# Altium PCB Shock_Sensor.PcbDoc (part 2 of 2)
Units mm, origin at the board's own origin, x right, y up, seen from the top; angles counter-clockwise.
Board outline 51.25 x 37.38 mm, 2 copper layers (Top Layer, Bottom Layer), stack 1.448 mm thick; 59 components, 38 nets, 215 pads, 74 vias.
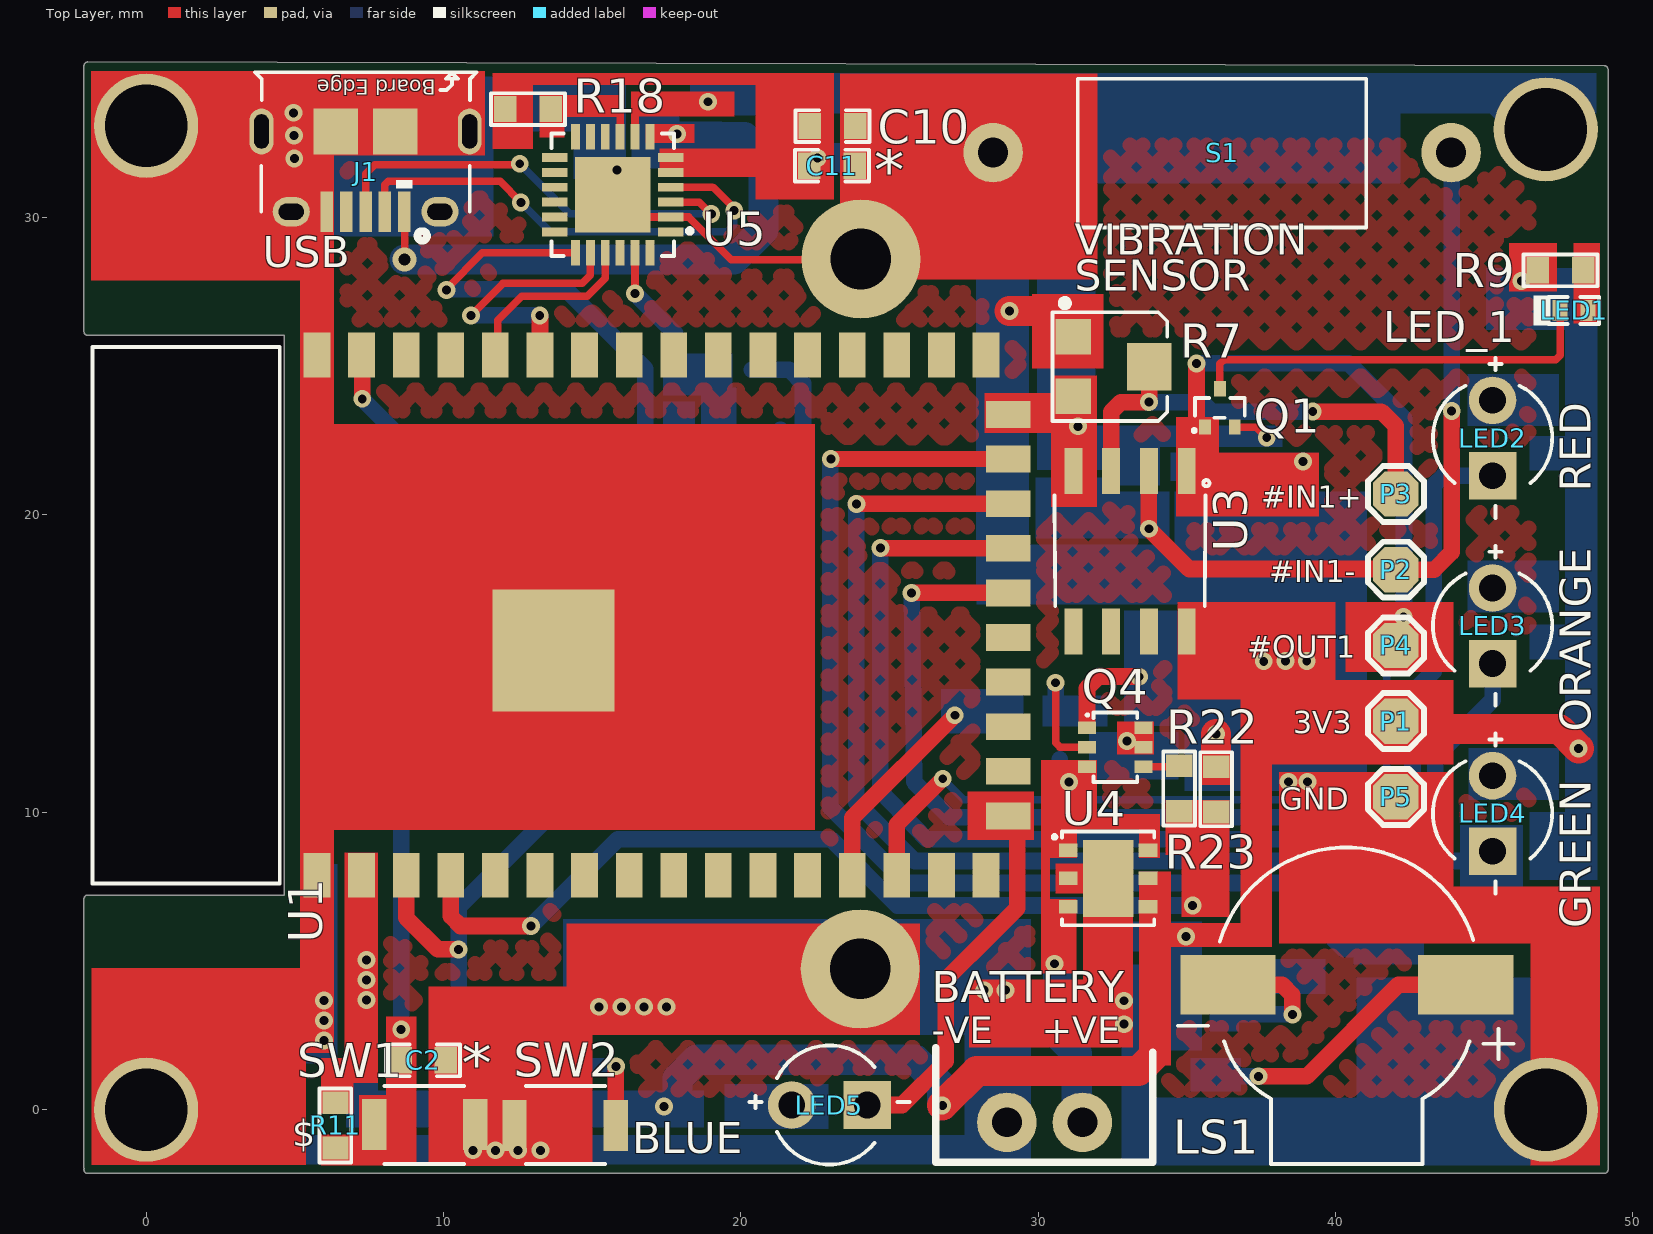
[diagram p0: Top Layer view]

## Part data (continued)
R12 R13 R14: library part RC0603FR-07560RL, "YAGEO - RC0603FR-07560RL - SMD Chip Resistor, 0603 [1608 Metric], 560 ohm, RC Series, 75 V, Thick Film, 100 mW", Case Code (Imperial)=0603, Case Code (Metric)=1608, Manufacturer=Yageo, Max Operating Temperature=155°C, Max Power Dissipation=100mW, Min Operating Temperature=-55°C, Package Quantity=5000, Resistance Tolerance=1%, Resistor Type="Thick Film", Supplier Part Number 1=311-560HRCT-ND, Temperature Coefficient=100ppm/°C, Voltage Rating=75V, Voltage Rating (DC)=50V, Case/Package=0603, Category="Chip SMD Resistors", ComponentLink1Description=https://datasheet.ciiva.com/11808/0900766b80f96399-11808127.pdf?src-supplier=RSComponents, ComponentLink1URL=https://datasheet.ciiva.com/11808/0900766b80f96399-11808127.pdf?src-supplier=RSComponents, ComponentLink2Description=https://datasheet.ciiva.com/46412/443971-46412853.pdf?src-supplier=Element14, ComponentLink2URL=https://datasheet.ciiva.com/46412/443971-46412853.pdf?src-supplier=Element14, ComponentLink3Description=https://datasheet.ciiva.com/7746/443971-7746374.pdf?src-supplier=Element14, ComponentLink3URL=https://datasheet.ciiva.com/7746/443971-7746374.pdf?src-supplier=Element14, ComponentLink4Description=https://datasheet.ciiva.com/7746/443971-7746375.pdf?src-supplier=Element14, ComponentLink4URL=https://datasheet.ciiva.com/7746/443971-7746375.pdf?src-supplier=Element14, ComponentLink5Description=https://datasheet.ciiva.com/2454/pyu-r-int-thick-7-2454381.pdf?src-supplier=Digi-Key, ComponentLink5URL=https://datasheet.ciiva.com/2454/pyu-r-int-thick-7-2454381.pdf?src-supplier=Digi-Key, ComponentLink6Description=https://datasheet.ciiva.com/2454/pyu-r-int-thick-7-2454382.pdf?src-supplier=Digi-Key, ComponentLink6URL=https://datasheet.ciiva.com/2454/pyu-r-int-thick-7-2454382.pdf?src-supplier=Digi-Key, ComponentLink7Description=https://datasheet.ciiva.com/2454/pyu-r-int-thick-7-2454383.pdf?src-supplier=Digi-Key, ComponentLink7URL=https://datasheet.ciiva.com/2454/pyu-r-int-thick-7-2454383.pdf?src-supplier=Digi-Key, Construction=Rectangular, Depth=0.8mm, Features="Moisture Resistant", Height=0.45mm, Lead Free="Lead Free", Length=1.6mm, Manufacturer Part Number=RC0603FR-07560RL, Military Standard=Not, Number of Pins=2, Number of Terminations=2, Packaging="Tape and Reel", Power Rating=100mW, Pricing 1="1=0.10000, 10=0.02400, 100=0.00970, 1000=0.00436, 2500=0.00378 (USD)", REACH SVHC="No SVHC", Resistance=560R, RoHS=Yes, RoHS Compliant=Yes, Series=RC, Stock 1=40728, Supplier 1=Digi-Key, Technology="THICK FILM", Termination=SMD/SMT, Tolerance=1%, Weight=7.1E-05oz, Width=0.8mm, Working Voltage=75V
R18: library part RMCF0603JJ1K00, "RES 1K OHM 5% 1/10W 0603", Case Code (Imperial)=0603, Case Code (Metric)=1608, Manufacturer="Stackpole Electronics", Max Operating Temperature=155°C, Max Power Dissipation=100mW, Min Operating Temperature=-55°C, Resistance=1kR, Resistor Type="Thick Film", Supplier Part Number 1=RMCF0603JJ1K00CT-ND, Temperature Coefficient=200ppm/°C, Tolerance=5%, Case/Package=0603, Category="Chip SMD Resistors", ComponentLink1Description=https://www.seielect.com/catalog/SEI-Packaging.pdf?src-supplier=Digi-Key, ComponentLink1URL=https://www.seielect.com/catalog/SEI-Packaging.pdf?src-supplier=Digi-Key, ComponentLink2Description=http://www.seielect.com/Catalog/SEI-RMCF_RMCP.pdf?src-supplier=Future+Electronics, ComponentLink2URL=http://www.seielect.com/Catalog/SEI-RMCF_RMCP.pdf?src-supplier=Future+Electronics, ComponentLink3Description=https://www.seielect.com/Catalog/SEI-RMCF_RMCP.pdf?src-supplier=Digi-Key, ComponentLink3URL=https://www.seielect.com/Catalog/SEI-RMCF_RMCP.pdf?src-supplier=Digi-Key, Features="Automotive AEC-Q200", Height=0.022inch, Lead Free="Lead Free", Length=0.061inch, Manufacturer Part Number=RMCF0603JJ1K00, Mount="Surface Mount", Number of Terminations=2, Packaging="Tape and Reel", Power Rating=100mW, Pricing 1="1=0.10000, 10=0.01500, 100=0.00610, 1000=0.00274, 2500=0.00238, 5000=0.00197 (USD)", RoHS=Yes, Stock 1=256965, Supplier 1=Digi-Key, Width=0.031inch
R19: library part ERJ-3EKF2212V, "RES SMD 22.1K OHM 1% 1/10W 0603", Case Code (Imperial)=0603, Case Code (Metric)=1608, Manufacturer=Panasonic, Max Operating Temperature=155°C, Max Power Dissipation=100mW, Min Operating Temperature=-55°C, Package Quantity=1, Resistance=22.1kR, Resistance Tolerance=1%, Resistor Type="Thick Film", Supplier Part Number 1=P22.1KHCT-ND, Temperature Coefficient=100ppm/°C, Voltage Rating=75V, Voltage Rating (DC)=50V, Case/Package=0603, Category="Chip SMD Resistors", ComponentLink1Description=https://datasheet.ciiva.com/34303/1987775-34303580.pdf?src-supplier=Jameco, ComponentLink1URL=https://datasheet.ciiva.com/34303/1987775-34303580.pdf?src-supplier=Jameco, ComponentLink2Description=https://datasheet.ciiva.com/43460/426256-43460567.pdf?src-supplier=Farnell, ComponentLink2URL=https://datasheet.ciiva.com/43460/426256-43460567.pdf?src-supplier=Farnell, ComponentLink3Description=https://datasheet.ciiva.com/46389/426256-46389980.pdf?src-supplier=Element14, ComponentLink3URL=https://datasheet.ciiva.com/46389/426256-46389980.pdf?src-supplier=Element14, ComponentLink4Description=https://datasheet.ciiva.com/46377/426256-46377981.pdf?src-supplier=Element14, ComponentLink4URL=https://datasheet.ciiva.com/46377/426256-46377981.pdf?src-supplier=Element14, ComponentLink5Description=https://datasheet.ciiva.com/28545/1678782-28545289.pdf?src-supplier=Element14, ComponentLink5URL=https://datasheet.ciiva.com/28545/1678782-28545289.pdf?src-supplier=Element14, ComponentLink6Description=https://datasheet.ciiva.com/28693/1678782-28693551.pdf?src-supplier=Element14, ComponentLink6URL=https://datasheet.ciiva.com/28693/1678782-28693551.pdf?src-supplier=Element14, ComponentLink7Description=https://datasheet.ciiva.com/24026/aoa0000ce2-24026361.pdf?src-supplier=Mouser, ComponentLink7URL=https://datasheet.ciiva.com/24026/aoa0000ce2-24026361.pdf?src-supplier=Mouser, ComponentLink8Description=https://datasheet.ciiva.com/16784/70260748-16784939.pdf?src-supplier=Allied+Electronics, ComponentLink8URL=https://datasheet.ciiva.com/16784/70260748-16784939.pdf?src-supplier=Allied+Electronics, ComponentLink9Description=https://datasheet.ciiva.com/16440/aoa0000ce2-16440186.pdf?src-supplier=Future+Electronics, ComponentLink9URL=https://datasheet.ciiva.com/16440/aoa0000ce2-16440186.pdf?src-supplier=Future+Electronics, ComponentLink10Description=https://datasheet.ciiva.com/48531/aoa0000ce2-48531050.pdf?src-supplier=Avnet, ComponentLink10URL=https://datasheet.ciiva.com/48531/aoa0000ce2-48531050.pdf?src-supplier=Avnet, ComponentLink11Description=https://datasheet.ciiva.com/30229/aoa0000ce2-30229148.pdf?src-supplier=Onlinecomponents.com, ComponentLink11URL=https://datasheet.ciiva.com/30229/aoa0000ce2-30229148.pdf?src-supplier=Onlinecomponents.com, ComponentLink12Description=https://datasheet.ciiva.com/17210/aoa0000ce2-17210842.pdf?src-supplier=Avnet+Europe, ComponentLink12URL=https://datasheet.ciiva.com/17210/aoa0000ce2-17210842.pdf?src-supplier=Avnet+Europe, Construction=Rectangular, Contact Plating=Tin, Depth=0.8mm, Features="Automotive AEC-Q200", Height=0.45mm, Lead Free="Lead Free", Length=1.6mm, Manufacturer Part Number=ERJ-3EKF2212V, Military Standard=Not, Mount="Surface Mount", Number of Terminations=2, Packaging="Tape and Reel", Power Rating=100mW, Pricing 1="1=0.10000, 10=0.03900, 100=0.01570, 1000=0.00707, 2500=0.00614 (USD)", Radiation Hardening=No, REACH SVHC="No SVHC", RoHS=Yes, RoHS Compliant=Yes, Series=ERJ, Size Code=0603, Stock 1=112227, Supplier 1=Digi-Key, Technology="THICK FILM", Termination=SMD/SMT, Tolerance=1%, Width=0.031inch
R20: library part RC0603FR-0747K5L, "Res Thick Film 0603 47.5K Ohm 1% 0.1W(1/10W) ±100ppm/C Epoxy SMD T/R", Case Code (Imperial)=0603, Case Code (Metric)=1608, Manufacturer=Yageo, Max Operating Temperature=155°C, Max Power Dissipation=100mW, Min Operating Temperature=-55°C, Package Quantity=1, Resistance=47.5kR, Resistance Tolerance=1%, Resistor Type="Thick Film", Supplier Part Number 1=311-47.5KHRCT-ND, Temperature Coefficient=100ppm/°C, Voltage Rating=50V, Case/Package=0603, Category="Chip SMD Resistors", ComponentLink1Description=https://datasheet.ciiva.com/11808/0900766b80f96399-11808343.pdf?src-supplier=RSComponents, ComponentLink1URL=https://datasheet.ciiva.com/11808/0900766b80f96399-11808343.pdf?src-supplier=RSComponents, ComponentLink2Description=https://datasheet.ciiva.com/2454/pyu-r-int-thick-7-2454789.pdf?src-supplier=Digi-Key, ComponentLink2URL=https://datasheet.ciiva.com/2454/pyu-r-int-thick-7-2454789.pdf?src-supplier=Digi-Key, ComponentLink3Description=https://datasheet.ciiva.com/12555/rc0603-272842-12555285.pdf?src-supplier=Mouser, ComponentLink3URL=https://datasheet.ciiva.com/12555/rc0603-272842-12555285.pdf?src-supplier=Mouser, ComponentLink4Description=https://datasheet.ciiva.com/2454/pyu-r-int-thick-7-2454790.pdf?src-supplier=Digi-Key, ComponentLink4URL=https://datasheet.ciiva.com/2454/pyu-r-int-thick-7-2454790.pdf?src-supplier=Digi-Key, ComponentLink5Description=https://datasheet.ciiva.com/2454/pyu-r-int-thick-7-2454791.pdf?src-supplier=Digi-Key, ComponentLink5URL=https://datasheet.ciiva.com/2454/pyu-r-int-thick-7-2454791.pdf?src-supplier=Digi-Key, ComponentLink6Description=https://datasheet.ciiva.com/15189/getdatasheetpartid-135115-15189741.pdf?src-supplier=Verical, ComponentLink6URL=https://datasheet.ciiva.com/15189/getdatasheetpartid-135115-15189741.pdf?src-supplier=Verical, Construction=Rectangular, Depth=0.8mm, Features="Moisture Resistant", Height=0.45mm, Lead Free="Lead Free", Length=1.6mm, Manufacturer Part Number=RC0603FR-0747K5L, Military Standard=Not, Number of Pins=2, Number of Terminations=2, Packaging="Tape and Reel", Power Rating=100mW, Pricing 1="1=0.10000, 10=0.02400, 100=0.00970, 1000=0.00436, 2500=0.00378 (USD)", REACH SVHC="No SVHC", RoHS=Yes, RoHS Compliant=Yes, Series=RC, Size Code=0603, Stock 1=828443, Supplier 1=Digi-Key, Technology="THICK FILM", Termination=SMD/SMT, Tolerance=1%, Voltage Rating (DC)=50V, Width=0.031inch
R22 R23 R24 R25: library part RC0603JR-07100KL, "Res Thick Film 0603 100K Ohm 5% 1/10W 100ppm/C Molded SMD SMD Paper T/R", Case Code (Imperial)=0603, Case Code (Metric)=1608, Manufacturer=Yageo, Max Operating Temperature=155°C, Max Power Dissipation=100mW, Min Operating Temperature=-55°C, Resistance=100kR, Resistance Tolerance=5%, Resistor Type="Thick Film", Supplier Part Number 1=311-100KGRCT-ND, Temperature Coefficient=100ppm/°C, Voltage Rating=50V, Case/Package=0603, Category="Chip SMD Resistors", ComponentLink1Description=https://datasheet.ciiva.com/7746/443971-7746424.pdf?src-supplier=Element14, ComponentLink1URL=https://datasheet.ciiva.com/7746/443971-7746424.pdf?src-supplier=Element14, ComponentLink2Description=https://datasheet.ciiva.com/7983/443971-7983686.pdf?src-supplier=Element14, ComponentLink2URL=https://datasheet.ciiva.com/7983/443971-7983686.pdf?src-supplier=Element14, ComponentLink3Description=https://datasheet.ciiva.com/7746/443971-7746423.pdf?src-supplier=Element14, ComponentLink3URL=https://datasheet.ciiva.com/7746/443971-7746423.pdf?src-supplier=Element14, ComponentLink4Description=https://datasheet.ciiva.com/8887/pyu-rc0603-51-rohs-l-4-8887903.pdf?src-supplier=Avnet, ComponentLink4URL=https://datasheet.ciiva.com/8887/pyu-rc0603-51-rohs-l-4-8887903.pdf?src-supplier=Avnet, Contact Plating=Tin,Matte, Features="Moisture Resistant", Lead Free="Lead Free", Manufacturer Part Number=RC0603JR-07100KL, Number of Pins=2, Number of Terminations=2, Packaging="Tape and Reel", Power Rating=100mW, Pricing 1="1=0.10000, 10=0.02000, 100=0.00800, 1000=0.00360, 2500=0.00312 (USD)", Radiation Hardening=No, REACH SVHC="No SVHC", RoHS=Yes, RoHS Compliant=Yes, Series=RC, Size Code=0603, Stock 1=1210037, Supplier 1=Digi-Key, Termination=SMD/SMT, Tolerance=5%, Voltage Rating (DC)=50V, Width=0.8mm
R27: library part RC0603FR-07560RL, "RES 560 OHM 1% 1/10W 0603", Case Code (Imperial)=0603, Case Code (Metric)=1608, Manufacturer=Yageo, Max Operating Temperature=155°C, Max Power Dissipation=100mW, Min Operating Temperature=-55°C, Package Quantity=5000, Resistance Tolerance=1%, Resistor Type="Thick Film", Supplier Part Number 1=311-560HRCT-ND, Temperature Coefficient=100ppm/°C, Voltage Rating=75V, Voltage Rating (DC)=50V, Case/Package=0603, Category="Chip SMD Resistors", ComponentLink1Description=https://datasheet.ciiva.com/11808/0900766b80f96399-11808127.pdf?src-supplier=RSComponents, ComponentLink1URL=https://datasheet.ciiva.com/11808/0900766b80f96399-11808127.pdf?src-supplier=RSComponents, ComponentLink2Description=https://datasheet.ciiva.com/46412/443971-46412853.pdf?src-supplier=Element14, ComponentLink2URL=https://datasheet.ciiva.com/46412/443971-46412853.pdf?src-supplier=Element14, ComponentLink3Description=https://datasheet.ciiva.com/7746/443971-7746374.pdf?src-supplier=Element14, ComponentLink3URL=https://datasheet.ciiva.com/7746/443971-7746374.pdf?src-supplier=Element14, ComponentLink4Description=https://datasheet.ciiva.com/7746/443971-7746375.pdf?src-supplier=Element14, ComponentLink4URL=https://datasheet.ciiva.com/7746/443971-7746375.pdf?src-supplier=Element14, ComponentLink5Description=https://datasheet.ciiva.com/2454/pyu-r-int-thick-7-2454381.pdf?src-supplier=Digi-Key, ComponentLink5URL=https://datasheet.ciiva.com/2454/pyu-r-int-thick-7-2454381.pdf?src-supplier=Digi-Key, ComponentLink6Description=https://datasheet.ciiva.com/2454/pyu-r-int-thick-7-2454382.pdf?src-supplier=Digi-Key, ComponentLink6URL=https://datasheet.ciiva.com/2454/pyu-r-int-thick-7-2454382.pdf?src-supplier=Digi-Key, ComponentLink7Description=https://datasheet.ciiva.com/2454/pyu-r-int-thick-7-2454383.pdf?src-supplier=Digi-Key, ComponentLink7URL=https://datasheet.ciiva.com/2454/pyu-r-int-thick-7-2454383.pdf?src-supplier=Digi-Key, Construction=Rectangular, Depth=0.8mm, Features="Moisture Resistant", Height=0.45mm, Lead Free="Lead Free", Length=1.6mm, Manufacturer Part Number=RC0603FR-07560RL, Military Standard=Not, Number of Pins=2, Number of Terminations=2, Packaging="Tape and Reel", Power Rating=100mW, Pricing 1="1=0.10000, 10=0.02400, 100=0.00970, 1000=0.00436, 2500=0.00378 (USD)", REACH SVHC="No SVHC", Resistance=560R, RoHS=Yes, RoHS Compliant=Yes, Series=RC, Stock 1=40728, Supplier 1=Digi-Key, Technology="THICK FILM", Termination=SMD/SMT, Tolerance=1%, Weight=7.1E-05oz, Width=0.8mm, Working Voltage=75V
S1: "Vibration sensor", ComponentLink1Description=Aliexpress, ComponentLink1URL=https://tr.aliexpress.com/item/1005003062565290.html?spm=a2g0o.productlist.0.0.6dc62332GmTktf&algo_pvid=31de4c40-91e4-4476-89b4-9a70fcc8c0f5&algo_exp_id=31de4c40-91e4-4476-89b4-9a70fcc8c0f5-1&pdp_ext_f=%7B%7D
SW1 SW2: "SWITCH TACTILE SPST-NO 0.05A 12V", Contact Current Rating=50mA, Contact Resistance=100mR, Insulation Resistance=100MR, Manufacturer=Omron, Max Operating Temperature=70°C, Max Voltage Rating (DC)=12V, Min Operating Temperature=-25°C, Operating Force=1.5N, Package Quantity=1, Ratings="Dust Proof,IP40", Supplier Part Number 1=SW1020CT-ND, Actuator Length=0.4mm, Actuator Type=Standard, Category="Tactile Switches", ComponentLink1Description=https://datasheet.ciiva.com/22696/1685550-22696214.pdf?src-supplier=Element14, ComponentLink1URL=https://datasheet.ciiva.com/22696/1685550-22696214.pdf?src-supplier=Element14, ComponentLink2Description=https://datasheet.ciiva.com/26917/getdatasheetpartid-552554-26917552.pdf?src-supplier=Verical, ComponentLink2URL=https://datasheet.ciiva.com/26917/getdatasheetpartid-552554-26917552.pdf?src-supplier=Verical, ComponentLink3Description=https://datasheet.ciiva.com/1532/1685550-1532680.pdf?src-supplier=Element14, ComponentLink3URL=https://datasheet.ciiva.com/1532/1685550-1532680.pdf?src-supplier=Element14, ComponentLink4Description=https://datasheet.ciiva.com/1634/1685550-1634396.pdf?src-supplier=Farnell, ComponentLink4URL=https://datasheet.ciiva.com/1634/1685550-1634396.pdf?src-supplier=Farnell, ComponentLink5Description=https://datasheet.ciiva.com/14142/b3u-eng-datasheet-14142540.pdf?src-supplier=Distrelec, ComponentLink5URL=https://datasheet.ciiva.com/14142/b3u-eng-datasheet-14142540.pdf?src-supplier=Distrelec, ComponentLink6Description=https://datasheet.ciiva.com/16862/70176037-16862846.pdf?src-supplier=Allied+Electronics, ComponentLink6URL=https://datasheet.ciiva.com/16862/70176037-16862846.pdf?src-supplier=Allied+Electronics, ComponentLink7Description=https://datasheet.ciiva.com/16155/en-b3u-16155021.pdf?src-supplier=Onlinecomponents.com, ComponentLink7URL=https://datasheet.ciiva.com/16155/en-b3u-16155021.pdf?src-supplier=Onlinecomponents.com, ComponentLink8Description=https://datasheet.ciiva.com/2900/b3u-1110-2900030.pdf?src-supplier=Digi-Key, ComponentLink8URL=https://datasheet.ciiva.com/2900/b3u-1110-2900030.pdf?src-supplier=Digi-Key, ComponentLink9Description=https://datasheet.ciiva.com/2900/b3u-1110-2900031.pdf?src-supplier=Digi-Key, ComponentLink9URL=https://datasheet.ciiva.com/2900/b3u-1110-2900031.pdf?src-supplier=Digi-Key, ComponentLink10Description=https://datasheet.ciiva.com/2900/b3u-1110-2900029.pdf?src-supplier=Digi-Key, ComponentLink10URL=https://datasheet.ciiva.com/2900/b3u-1110-2900029.pdf?src-supplier=Digi-Key, Contact Material=Silver, Current Rating=50mA, Depth=2.5mm, Electrical Life=200000Cycles, Height=1.2mm, Illumination Type=Non-Illuminated,Illuminated, Lead Free="Lead Free", Length=4mm, Manufacturer Part Number=B3U-1000P, Max Current Rating=50mA, Mechanical Life=200000Cycles, Mount="Surface Mount", Orientation=Straight, Packaging="Tape and Reel", Pricing 1="1=0.96000, 10=0.92700, 25=0.86640, 100=0.75220, 250=0.68448, 500=0.63456, 1000=0.62388 (USD)", REACH SVHC=Unknown, RoHS=Yes, RoHS Compliant=Yes, Series=B3U, Supplier 1=Digi-Key, Switch Function=Off-Mom, Switch Travel=0.15mm, Termination=SMD/SMT, Throw Configuration=SPST, Voltage Rating (DC)=12V, Weight=0.000776oz, Width=3mm
U1: "RX TXRX MOD WIFI SURFACE MOUNT", Manufacturer="Espressif Systems", Package=Custom, ComponentLink1Description=LCSC, ComponentLink1URL=https://lcsc.com/product-detail/WiFi-Modules_Espressif-Systems-ESP32-S2-WROOM-4MB_C967025.html, Manufacturer Part No=ESP32-S2-WROOM(4MB)
U3: "STMICROELECTRONICS - LM393ADT - Analogue Comparator, Low Power, 2 Comparators, 300 ns, 2V to 36V, ± 1V to ± 18V, SOIC, 8 Pins", Case/Package=SO, Input Bias Current=100nA, Input Offset Voltage (Vos)=2mV, Manufacturer=STMicroelectronics, Max Dual Supply Voltage=18V, Max Operating Temperature=70°C, Max Power Dissipation=830mW, Max Supply Current=1mA, Max Supply Voltage=36V, Min Dual Supply Voltage=1V, Min Operating Temperature=0°C, Min Supply Voltage=2V, Natural Thermal Resistance=125°C/W, Output Current=18mA, Output Current per Channel=100pA, Package Quantity=2500, Quiescent Current=2.5mA, Supplier Part Number 1=497-4267-1-ND, Voltage Gain=106.02dB, Category=Comparators, ComponentLink1Description=https://datasheet.ciiva.com/15131/getdatasheetpartid-303912-15131180.pdf?src-supplier=Verical, ComponentLink1URL=https://datasheet.ciiva.com/15131/getdatasheetpartid-303912-15131180.pdf?src-supplier=Verical, ComponentLink2Description=https://datasheet.ciiva.com/1827/cd00000465-1827216.pdf?src-supplier=Digi-Key, ComponentLink2URL=https://datasheet.ciiva.com/1827/cd00000465-1827216.pdf?src-supplier=Digi-Key, ComponentLink3Description=https://datasheet.ciiva.com/1827/cd00000465-1827217.pdf?src-supplier=Digi-Key, ComponentLink3URL=https://datasheet.ciiva.com/1827/cd00000465-1827217.pdf?src-supplier=Digi-Key, ComponentLink4Description=https://datasheet.ciiva.com/1827/cd00000465-1827218.pdf?src-supplier=Digi-Key, ComponentLink4URL=https://datasheet.ciiva.com/1827/cd00000465-1827218.pdf?src-supplier=Digi-Key, ComponentLink5Description=https://datasheet.ciiva.com/4463/cd00000465-4463932.pdf?src-supplier=Mouser, ComponentLink5URL=https://datasheet.ciiva.com/4463/cd00000465-4463932.pdf?src-supplier=Mouser, ComponentLink6Description=https://datasheet.ciiva.com/16444/cd00000465-16444173.pdf?src-supplier=Future+Electronics, ComponentLink6URL=https://datasheet.ciiva.com/16444/cd00000465-16444173.pdf?src-supplier=Future+Electronics, Height=1.5mm, Lead Free="Lead Free", Length=5mm, Manufacturer Part Number=LM393ADT, Max Input Current=100nA, Mount="Surface Mount", Nominal Supply Current=1mA, Number of Channels=2, Number of Elements=2, Number of Pins=8, Output Type=TTL, Packaging="Tape and Reel", Power Dissipation=830mW, Pricing 1="1=0.43000, 10=0.36800, 25=0.34360, 100=0.27480, 250=0.25520, 500=0.21594, 1000=0.16687 (USD)", Radiation Hardening=No, Response Time=1.3us, RoHS=Yes, RoHS Compliant=Yes, Series=LM393, Stock 1=2751, Supplier 1=Digi-Key, Supply Current=1mA, Technology=BIPOLAR, Type="General Purpose", Width=4mm
U4: "ON Semiconductor NCP692MN33T2G, LDO Voltage Regulator, 1A, 3.3 V 2%, 1.5  6 Vin, 6-Pin DFN", Case/Package=DFN, Dropout Voltage=180mV, Manufacturer="ON Semiconductor", Max Input Voltage=6V, Max Operating Temperature=85°C, Max Output Current=1A, Min Current Limit=1.1A, Min Input Voltage=1.5V, Min Operating Temperature=-40°C, Output Voltage=3.3V, Output Voltage Accuracy=2%, Package Quantity=3000, Supplier Part Number 1=NCP692MN33T2GOSCT-ND, Accuracy=2%, Category="Voltage Regulators - Linear", ComponentLink1Description=https://datasheet.ciiva.com/15271/ncp690-d-15271367.pdf?src-supplier=Arrow+Europe, ComponentLink1URL=https://datasheet.ciiva.com/15271/ncp690-d-15271367.pdf?src-supplier=Arrow+Europe, ComponentLink2Description=https://datasheet.ciiva.com/8231/ncp690-d-8231800.pdf?src-supplier=Avnet, ComponentLink2URL=https://datasheet.ciiva.com/8231/ncp690-d-8231800.pdf?src-supplier=Avnet, ComponentLink3Description=https://datasheet.ciiva.com/2062/ncp690-d-2062340.pdf?src-supplier=Digi-Key, ComponentLink3URL=https://datasheet.ciiva.com/2062/ncp690-d-2062340.pdf?src-supplier=Digi-Key, ComponentLink4Description=https://datasheet.ciiva.com/26179/ncp690-d-26179095.pdf?src-supplier=Avnet+Europe, ComponentLink4URL=https://datasheet.ciiva.com/26179/ncp690-d-26179095.pdf?src-supplier=Avnet+Europe, Halogen Free="Halogen Free", Height=0.95mm, Lead Free="Lead Free", Length=3mm, Manufacturer Part Number=NCP692MN33T2G, Mount="Surface Mount", Number of Outputs=1, Number of Pins=6, Number of Regulators=1, Output Current=1A, Output Type=Fixed, Packaging="Tape and Reel", Polarity=Positive, Pricing 1="1=1.11000, 10=0.98800, 25=0.93800, 100=0.77040, 250=0.72016, 500=0.63642, 1000=0.55300 (USD)", Radiation Hardening=No, RoHS=Yes, RoHS Compliant=Yes, Supplier 1=Digi-Key, Width=3mm
U5: "IC USB TO UART BRIDGE QFN24", Manufacturer="Silicon Labs", Supplier Part Number 1=336-5888-1-ND, Category="Interface ICs", Manufacturer Part Number=CP2102N-A02-GQFN24R, Pricing 1="1=1.56000 (USD)", RoHS=Yes, Supplier 1=Digi-Key

## Free pads (board coordinates)
  round 2 hole 1: 1(31.486,-0.427) 2(28.946,-0.427)
  round 3.5 hole 2.78: MH1(47.068,32.966) MH2(47.068,0) MH3(0,0) MH4(0,33.091)
  round 4 hole 2.04: MH5(24.034,28.608) MH6(24.012,4.737)

## Via types
v1: diameter 0.6, hole 0.3, Top Layer to Bottom Layer, tented both sides, 72 vias
v2: diameter 0.8, hole 0.4, Top Layer to Bottom Layer, tented both sides, 1 vias
v3: diameter 0.6, hole 0.3, Top Layer to Bottom Layer, 1 vias

## Nets (pads, with @x,y where several pads share a name; then routed paths per layer and width w, separated by ;. In a path a pad name is that pad's centre, name@x,y a point inside that pad or via, vN(x,y) a via of type N, cw(c..) or ccw(c..) an arc to the next point about the centre after c; other vN are vias at no path point)
#IN1+: P3.1 R7.2 U3.3 | length 15.5
  Top Layer w0.559: U3.3 32.451,23.468 32.778,23.796 v1(33.726,23.796) ; R7.2 33.731,24.354 33.732,24.353 v1@33.732,23.802 ; v1(39.23,23.478) 41.541,23.478 42.027,22.992 P3.1
  Bottom Layer w0.559: v1(33.726,23.796) 35.508,23.796 35.826,23.478 v1(39.23,23.478)
#IN1-: C4.2 P2.1 R6.1 S1.2 U3.2 | length 25.6
  Top Layer w0.559: U3.2@33.721,20.79 v1(33.721,19.538) 33.742,19.517 33.761,19.498 35.074,18.185 P2.1@41.976,18.185 ; P2.1 43.316,18.16 43.906,18.75 43.906,23.497 v1(43.904,23.499)
  Bottom Layer w0.559: S1.2 43.904,32.164 v1(43.904,23.499)
#OUT1: P4.1 Q1.1 R8.1 R10.2 U1.14 U3.1 | length 42.5
  Top Layer w0.559: U1.14 25.242,9.585 v1(26.787,11.13) ; 35.321,22.863 v1(35.321,25.1) ; P4.1@41.544,15.639 P4.1@41.544,15.856 ; v1@42.241,16.761 42.281,16.722 v1(42.281,16.566)
  Bottom Layer w0.254: v1(26.787,11.13) 27.498,10.419 41.573,10.419 41.722,10.568 41.722,16.007 v1(42.281,16.566)
  Bottom Layer w0.559: v1(35.321,25.1) 40.448,25.1 42.301,23.247 42.301,16.587 v1(42.281,16.566)
  other v1: 38.903,21.798
A/D_IN: R22.1 R23.1 U1.4 | length 28.3
  Top Layer w0.559: U1.4 10.242,6.505 10.569,6.177 v1(12.944,6.177)
  Bottom Layer w0.559: v1(12.944,6.177) 15.865,9.098 23.027,9.098 25.257,6.868 34.888,6.868
  other v1: 35.193,6.868
BUZZ: D1.2 LS1.2 R1.1 | length 6.3
  Top Layer w0.559: LS1.2 38.209,4.196 38.539,3.866 38.539,3.209 38.536,3.206 v1(38.547,3.206)
  Bottom Layer w0.559: R1.1 36.21,3.612 36.617,3.206 v1(38.547,3.206)
BUZZER: Q5.1 R2.1 U1.25 | length 38.5
  Top Layer w0.559: v1@23.011,21.891 U1.25
  Bottom Layer w0.559: v1(23.023,21.879) 23.007,21.863 23.007,10.16 25.542,7.625 39.207,7.625 39.944,6.889 39.944,5.723 40.271,5.396 41.152,5.396 Q5.1 Q5.1@41.162,5.395 ; R2.1@42.479,5.395 R2.1
D+: J1.3 U5.3 | length 15.7
  Top Layer w0.254: J1.3@7.389,29.799 7.389,30.198 7.389,31.479 7.69,31.781 12.532,31.781 v1(12.563,31.811) ; U5.3 18.598,30.521 18.991,30.127 v1(19.004,30.127)
  Bottom Layer w0.254: v1(12.563,31.811) 14.247,30.127 v1(19.004,30.127)
D-: J1.2 U5.4 | length 16.4
  Top Layer w0.254: J1.2 J1.2 8.027,31.105 8.144,31.222 11.9,31.222 12.598,30.523 v1(12.598,30.513) ; U5.4 19.042,31.021 ; 19.087,30.999 19.774,30.313 v1(19.774,30.239)
  Bottom Layer w0.254: v1(12.598,30.513) 13.589,29.522 19.544,29.522 19.761,29.739 19.761,30.226 v1(19.774,30.239)
DTR: Q3.2 R15.2 U5.23 | length 4.6
  Top Layer w0.254: v1(16.438,27.448) U5.23
  Bottom Layer w0.559: v1@16.5,27.386 17.782,26.104 17.782,24.966 17.888,24.859 R15.2@18.028,24.859
ENABLE: C2.1 Q2.3 R11.1 SW1.1 U1.41 | length 30
  Top Layer w0.559: U1.41@7.247,25.174 7.265,25.156 v1(7.265,23.907)
  Bottom Layer w0.559: v1(7.265,23.907) 10.374,20.798 ; v1(8.575,2.698) 8.575,19.009 10.363,20.798 Q2.3
GND: C1.2 C2.2 C3.2 C4.1 C5.2 C6.2 C10.2 C11.2 C12.2 C13.2 C14.2 J1.5 J1.MH1 J1.MH2 J1.MH3 J1.MH4 J1.MP1 J1.MP2 P5.1 pad.2 pad.MH1 pad.MH2 pad.MH3 pad.MH4 pad.MH5 pad.MH6 Q1.2 Q4.1 Q5.2 R2.2 R7.3 R10.1 R20.2 R23.2 R25.2 S1.1 SW1.2 SW2.2 U1.1 U1.26 U1.42 U1.43 U3.4 U4.2 U4.7 U5.2 U5.25 | length 24.2
  Top Layer w0.254: v1@4.948,32.781 v1(4.966,32.764) ; v1(4.948,33.526) v1@5.014,33.592 ; U5.25@16.561,30.021 U5.2 18.243,30.021 19.673,28.59 pad.MH5@24.069,28.59 ; v1@31.333,22.856 v1(31.333,22.983) v1@31.333,23.237 ; Q1.2 37.338,22.957 v1(37.683,22.611)
  Top Layer w0.559: Q4.1@31.638,12.906 31.638,14.178 32.027,14.567 33.383,14.567 v1(33.391,14.559)
  Top Layer w1.016: U4.2@31.136,7.778 U4.7 U4.7@32.476,7.778 ; R23.2 v1(35.982,12.629)
  Bottom Layer w0.254: 5.806,4.171 5.857,4.171 ; v1@5.832,3.536 5.857,3.51 v1@5.857,2.825
  Bottom Layer w1.016: 30.546,31.654 31.283,32.39 34.686,32.39 ; 45.165,34.232 46.445,32.951 pad.MH1@47.002,32.951 ; pad.MH1@47.002,34.272 pad.MH1@48.136,34.272
  other v1: 10.988,-1.366 11.746,-1.366 12.503,-1.366 13.261,-1.366 5.984,2.328 32.883,2.875 5.984,3.001 15.228,3.46 15.985,3.46 16.743,3.46 17.501,3.46 5.984,3.674 32.883,3.663 28.184,4.018 28.895,4.018 38.42,11.029 39.055,11.029 15.834,31.6 4.981,31.994
GP_OUT: R26.2 U1.13 | length 6.8
  Top Layer w0.559: U1.13 23.742,9.812 v1(27.193,13.264)
IO14: LED5.1 U1.17 | length 12.4
  Top Layer w0.559: LED5.1 25.418,0.158 26.888,1.628 26.888,4.374 28.489,5.974 29.299,6.784 29.299,9.448 U1.17@29.073,9.674
IO19: LED2.1 U1.22 | length 40.2
  Top Layer w0.559: v1(25.742,17.379) U1.22
  Bottom Layer w0.559: v1(25.742,17.379) 25.823,11.023 27.011,9.835 42.258,9.835 42.586,10.162 42.586,14.026 43.297,14.737 43.297,20.988 43.624,21.316 LED2.1
IO20: LED3.1 U1.23 | length 38.1
  Top Layer w0.559: v1(24.69,18.891) U1.23
  Bottom Layer w0.559: v1(24.69,18.891) 24.69,10.715 26.247,9.098 42.589,9.098 43.348,9.857 43.348,11.842 45.278,13.772 LED3.1
IO21: LED4.1 U1.24 | length 37.6
  Top Layer w0.559: v1@23.884,20.395 23.899,20.379 U1.24
  Bottom Layer w0.559: v1@23.857,20.367 v1@23.884,20.395 ; v1@23.882,20.367 23.882,10.327 25.847,8.362 44.935,8.362 45.1,8.527 LED4.1@45.1,8.844
  other v1: 23.884,20.369
IO_0: C3.1 Q3.3 SW2.1 U1.3 | length 40.4
  Top Layer w0.559: U1.3 8.742,6.456 9.807,5.39 v1(10.505,5.39) ; SW2.1 15.794,-0.521 v1(15.794,1.458)
  Bottom Layer w0.559: v1(15.794,1.458) C3.1 10.833,1.453 10.505,1.78 v1(10.505,5.39) 10.505,6.817 22.087,18.399 22.087,24.427 21.625,24.889 Q3.3
NetD1_1: D1.1 L1.2 LS1.1 | length 9.4
  Top Layer w0.559: v1(37.404,1.123) 39.03,1.123 42.103,4.196 LS1.1
  Bottom Layer w0.559: D1.1 36.31,1.131 37.396,1.131 v1(37.404,1.123)
NetLED1_1: LED1.1 R9.1
NetLED1_2: LED1.2 Q1.3 | length 13.9
  Top Layer w0.254: Q1.3 36.109,25.079 36.257,25.227 47.403,25.227 47.551,25.376 LED1.2
NetLED2_2: LED2.2 R12.1 | length 0.1
  Bottom Layer w0.559: R12.1@47.005,23.856 R12.1@47.056,23.907
NetLED3_2: LED3.2 R13.1 | length 0
  Bottom Layer w0.559: R13.1@47.031,17.455 R13.1@47.037,17.461
NetLED4_2: LED4.2 R14.1 | length 0
  Bottom Layer w0.559: R14.1@47.005,11.181 R14.1@47.031,11.156
NetLED5_2: LED5.2 R27.1
NetQ2_1: Q2.1 R15.1
NetQ3_1: Q3.1 R16.1 | length 3
  Bottom Layer w0.559: R16.1@21.33,19.881 Q3.1@21.33,22.869
NetQ4_2: Q4.2 R25.1 R26.1 | length 4.2
  Top Layer w0.254: v1(30.583,14.357) 30.583,12.336 30.731,12.187 Q4.2
  Bottom Layer w0.559: v1(30.583,14.357) 30.586,14.354 30.586,13.335 R26.1
NetQ4_4: Q4.4 R22.2 | length 1.2
  Top Layer w0.254: Q4.4 R22.2@34.712,11.537 ; R22.2@34.407,11.537 R22.2@34.432,11.562
NetQ4_5: Q4.5 Q4.6 R24.2
  other v1: 32.984,12.4
NetQ5_3: Q5.3 R1.2
RSTb: R18.1 U5.9 | length 1.3
  Top Layer w0.254: 15.649,33.924 15.938,33.635 U5.9
RTS: Q2.2 R16.2 U5.19 | length 19.4
  Top Layer w0.254: v1(10.099,27.569) 10.099,27.615 11.305,28.821 U5.19
  Bottom Layer w0.559: v1(10.099,27.569) 10.11,27.569 10.131,27.59 14.112,27.59 16.779,24.923 16.779,20.306 17.107,19.978 17.682,19.978 17.742,19.919 18.684,19.919 ; R16.2@19.795,19.83 R16.2@19.845,19.83
RXD0: U1.38 U5.21 | length 6.5
  Top Layer w0.254: U1.38@11.747,25.174 11.823,25.25 11.823,26.545 12.634,27.356 14.838,27.356 15.438,27.955 U5.21
TXD0: U1.37 U5.20 | length 9.2
  Top Layer w0.254: v1(10.925,26.713) 11.999,27.788 14.66,27.788 14.938,28.066 U5.20
  Top Layer w0.559: v1(13.236,26.713) 13.241,26.708 13.241,25.179 U1.37@13.247,25.174
  Bottom Layer w0.559: v1(10.925,26.713) v1(13.236,26.713)
VBAT: C5.1 pad.1 Q4.3 R24.1 U4.1 U4.3 U4.6 | length 7
  Bottom Layer w0.559: 30.724,11.024 R24.1
  Bottom Layer w1.016: C5.1@30.673,5.492 30.673,2.515 31.298,1.891 31.298,-0.238 pad.1
  other v1: 30.546,4.907 31.029,11.024
VBUS: C12.1 C13.1 J1.1 R19.2 U5.7 | length 18.8
  Top Layer w0.254: v2(8.689,28.591) J1.1@8.689,30.199 ; U5.7 U5.7@16.947,32.73
  Bottom Layer w1.016: v2(8.689,28.591) 19.762,28.591 20.759,29.589 20.759,32.062 20.113,32.708 R19.2
  other v1: 17.851,32.812
VCC_3V3: C1.1 C6.1 C10.1 C11.1 C14.1 L1.1 P1.1 R6.2 R7.1 R8.2 R9.2 R11.2 R12.2 R13.2 R14.2 R18.2 R27.2 U1.2 U3.8 U4.4 U4.5 U5.5 U5.6 | length 43.7
  Top Layer w0.254: 18.517,31.648 18.519,31.651 18.519,31.742
  Top Layer w0.559: 35.307,15.354 35.321,15.339 35.321,14.751
  Top Layer w1.016: v1(26.772,0.147) 27.926,1.301 33.37,1.301 33.899,1.829 33.899,4.717 33.924,4.742 ; v1(29.028,26.859) 30.082,26.859 30.86,26.081 31.089,26.081 R7.1@31.089,25.989 ; R7.1@30.952,25.989 R7.1@31.089,25.989 ; R7.1 R7.1@31.089,25.989 ; R7.1@31.183,25.963 R7.1@31.183,25.988 ; 40.376,13.035 41.805,13.035 42.027,12.813 42.11,12.897 42.622,12.897 42.712,12.807 47.513,12.807 v3(48.174,12.146)
  Bottom Layer w1.016: 17.871,0.513 17.871,1.048 18.505,1.682 25.861,1.682 26.761,0.782 26.761,0.158 v1(26.772,0.147) ; v1(22.57,32.009) 25.06,32.009 27.221,29.848 28.872,29.848 28.997,29.723 ; 28.412,23.857 28.793,23.476 28.793,22.04 ; C6.1 34.661,5.822
  other v1: 17.414,0.107 7.407,3.688 7.407,4.361 7.407,5.034 34.966,5.822 37.583,15.08 38.318,15.093 39.03,15.093 46.243,27.869
VCC_5V: R19.1 R20.1 U5.8 | length 1
  Top Layer w0.254: U5.8 16.438,33.722 ; v1@18.867,33.871 v1(18.893,33.896)
pads on no net: D1.3 J1.4 U1.5 U1.6 U1.7 U1.8 U1.9 U1.10 U1.11 U1.12 U1.15 U1.16 U1.18 U1.19 U1.20 U1.21 U1.27 U1.28 U1.29 U1.30 U1.31 U1.32 U1.33 U1.34 U1.35 U1.36 U1.39 U1.40 U3.5 U3.6 U3.7 U5.1 U5.10 U5.11 U5.12 U5.13 U5.14 U5.15 U5.16 U5.17 U5.18 U5.22 U5.24

## Polygon pours and split planes (outlines as drawn)
no net on Top Layer "Polygon_1" (hatched 45Degree grid 0.762 track 0.508, remove dead copper, pour order 3): 5.705,32.449 46.494,32.449 46.494,0.524 46.376,0.642 5.705,0.642
GND on Bottom Layer "Polygon_2" (hatched 45Degree grid 0.762 track 0.508, remove dead copper, pour order 2): 5.705,32.449 46.494,32.449 46.494,0.524 46.376,0.642 5.705,0.642

## Other copper
Top Layer:
  rectangle net VCC_5V: 16.297,33.406 19.776,34.244
  rectangle net GND: 27.676,2.088 33.188,4.374
  rectangle net GND: 35.474,10.927 36.49,11.511
  rectangle net VBAT: 30.089,6.203 30.394,9.987
  rectangle net VCC_3V3: 34,5.466 37.861,6.279
  rectangle net VCC_3V3: 36.794,5.542 37.861,14.915
  rectangle net VCC_3V3: 36.794,11.613 43.957,14.458
  rectangle net GND: 30.571,7.27 31.136,8.286
  region net VBAT: 31.308,9.937 30.317,9.937 30.317,8.463 31.308,8.463
  rectangle net VBAT: 30.724,9.429 33.772,9.937
  rectangle net NetQ4_5: 32.654,11.943 33.899,13.061
  rectangle net VBAT: 33.391,8.463 34.102,9.937
  rectangle net A/D_IN: 34.28,8.565 36.439,10.419
  rectangle net A/D_IN: 34.813,6.482 36.439,8.997
  rectangle net VCC_3V3: 33.391,1.478 34.458,8.006
  rectangle net VBAT: 30.089,9.657 31.968,11.765
  rectangle net GND: 31.511,2.342 33.188,6.609
  rectangle net GND: 14.138,2.52 26.025,6.254
  rectangle net GND: 5.705,9.403 22.494,23.068
  rectangle net GND: 5.171,4.018 6.314,32.449
  rectangle net GND: 28.184,22.764 31.638,24.11
  rectangle net GND: 46.548,-1.874 48.885,5.898
  rectangle net GND: 38.09,6.558 43.957,11.359
  rectangle net VCC_3V3: 34,5.847 34.153,6.635
  region net VBAT: 31.283,7.092 30.089,7.092 30.089,4.577 31.283,4.577
  rectangle net GND: 9.489,-1.9 15.001,4.145
  rectangle net ENABLE: 7.153,-1.214 8.6,0.488
  rectangle net ENABLE: 5.883,-1.874 9.083,-0.833
  rectangle net VCC_3V3: 5.883,-0.122 6.975,1.732
  rectangle net GND: -1.842,1.91 6.314,4.76
  rectangle net ENABLE: 8.067,-1.773 9.083,3.129
  rectangle net VCC_3V3: 17.269,31.359 21.275,32.332
  rectangle net GND: 30.422,20.274 31.968,24.694
  rectangle net VCC_3V3: 29.784,24.923 32.197,27.437
  rectangle net #OUT1: 40.325,14.712 43.957,17.074
  rectangle net GND: 23.332,27.92 31.994,34.854
  rectangle net IO14: 27.625,9.073 29.86,10.699
  rectangle net GND: 4.765,32.085 11.394,34.928
  rectangle net VCC_3V3: 45.837,27.513 47.437,29.139
  rectangle net NetLED1_1: 47.996,26.447 48.885,29.139
  rectangle net GND: 38.09,5.593 48.885,7.498
  rectangle net VCC_3V3: 34.686,13.797 39.995,17.074
  rectangle net VCC_3V3: 11.646,32.314 13.015,34.872
  rectangle net RSTb: 13.228,32.695 14.061,33.653
  rectangle net RSTb: 13.228,33.391 16.063,34.13
  rectangle net VCC_3V3: 12.311,34.468 20.996,34.872
  rectangle net VBUS: 16.784,32.51 18.443,33.155
  rectangle net VCC_3V3: 20.498,30.617 23.124,34.872
  rectangle net #OUT1: 35.552,19.944 39.436,22.103
  rectangle net GND: -1.834,-1.864 5.375,2.299
  rectangle net GND: -1.854,27.894 5.972,34.928
  rectangle net #OUT1: 34.635,19.944 36.083,23.297
  rectangle net VCC_3V3: 6.67,0.894 7.788,8.641
Bottom Layer:
  rectangle net GND: 31.968,2.19 33.01,4.882
  region net VBAT: 30.165,6.406 30.165,4.577 31.181,4.577 31.181,6.406
  rectangle net GND: 29.962,22.002 31.918,31.654
  rectangle net VCC_3V3: 46.523,7.727 48.047,10.013
  rectangle net VCC_3V3: 46.523,15.144 48.047,16.312
  rectangle net VCC_3V3: 46.523,21.494 48.047,22.662
  rectangle net NetLED4_2: 44.475,10.419 47.513,12.172
  rectangle net NetLED3_2: 44.427,16.718 47.513,18.471
  rectangle net NetLED2_2: 44.44,22.992 47.513,24.745
  rectangle net GND: 32.807,-1.849 33.848,4.882
  rectangle net GND: 33.696,-1.874 41.773,0.412
  rectangle net GND: -1.814,-1.849 28.463,-0.858
  rectangle net GND: 27.523,-1.849 29.759,3.409
  rectangle net GND: 14.011,2.52 29.759,6.406
  rectangle net GND: 40.706,-1.874 48.885,4.45
  rectangle net VCC_3V3: 34.585,18.7 38.547,20.782
  rectangle net GND: 32.883,12.908 35.423,14.28
  rectangle net GND: 32.883,13.467 36.794,16.795
  rectangle net GP_OUT: 26.736,12.654 29.505,14.153
  rectangle net VCC_3V3: 34.229,1.986 35.499,6.33
  rectangle net NetD1_1: 35.118,0.615 36.82,1.732
  rectangle net BUZZER: 40.604,4.882 42.967,5.873
  rectangle net NetQ5_3: 37.353,3.891 39.665,5.06
  rectangle net BUZZ: 35.753,2.621 36.744,4.984
  rectangle net VCC_3V3: 32.832,5.314 33.416,6.33
  rectangle net NetQ4_5: 31.714,11.105 34.712,12.705
  rectangle net NetQ4_2: 30.14,12.883 32.324,13.924
  rectangle net IO21: 44.186,7.27 46.294,9.581
  rectangle net VCC_3V3: 47.716,7.727 48.809,28.301
  rectangle net DTR: 17.388,24.026 19.725,25.433
  rectangle net VCC_3V3: 6.822,-0.604 18.76,0.64
  rectangle net NetLED5_2: 19.446,-0.655 22.951,0.869
  rectangle net GND: 34.915,10.724 41.062,13.95
  rectangle net VCC_3V3: 36.972,14.305 41.062,20.782
  rectangle net VCC_3V3: 27.93,16.998 38.039,18.999
  rectangle net GND: 32.654,20.986 34.102,22.154
  rectangle net #IN1-: 29.911,19.208 34.407,20.782
  rectangle net #OUT1: 34.44,21.148 39.436,22.103
  rectangle net GND: 10.302,32.898 16.142,34.747
  rectangle net DTR: 18.658,22.4 19.852,24.28
  rectangle net NetQ2_1: 17.388,21.308 18.455,23.823
  rectangle net GND: 27.193,31.146 42.179,33.635
  rectangle net VCC_3V3: 45.049,26.218 48.58,28.301
  rectangle net GND: 14.366,31.303 16.142,33.894
  rectangle net VBUS: 16.327,31.659 17.94,33.932
  rectangle net GND: 21.351,33.508 48.768,34.869
  rectangle net GND: 3.416,29.368 11.684,34.747
  rectangle net VCC_5V: 18.285,33.442 20.752,34.351
  rectangle net VCC_5V: 18.285,34.176 20.752,34.869
  rectangle net VBUS: 16.85,32.2 19.365,33.241
  rectangle net VCC_3V3: 27.904,17.582 29.682,30.358
  rectangle net RTS: 17.365,19.334 20.467,20.35
  rectangle net GND: 5.364,1.555 6.426,8.255
  rectangle net VCC_3V3: 6.723,-0.604 7.788,8.641
  rectangle net GND: 31.786,22.281 38.217,23.018
  rectangle net GND: 29.962,21.519 34.102,23.018
  rectangle net #IN1-: 29.911,20.122 32.324,21.265

## Silkscreen, mask and mechanical layers (free items; w line width, h text height)
Top Overlay:
  lines w0.254: 26.554,2.088 26.554,-1.773 33.848,-1.773 33.848,1.936
  text "*" at 24.478,30.393 h2.54
  text "VIBRATION" at 31.232,28.402 h1.78
  text "USB" at 3.927,27.971 h1.78
  text "SENSOR" at 31.232,27.183 h1.78
  text "LED_1" at 41.595,25.456 h1.78
  text "RED" at 48.936,20.782 h1.78 r90
  text "#IN1+" at 37.506,19.995 h1.27
  text "#IN1-" at 37.76,17.48 h1.27
  text "#OUT1" at 37.023,14.94 h1.27
  text "ORANGE" at 48.936,12.705 h1.78 r90
  text "3V3" at 38.572,12.4 h1.27
  text "GND" at 38.115,9.835 h1.27
  text "GREEN" at 48.936,6.101 h1.78 r90
  text "BATTERY" at 26.422,3.256 h1.78
  text "-VE" at 26.422,1.936 h1.52
  text "+VE" at 30.114,1.936 h1.52
  text "*" at 10.605,0.362 h2.54
  text "$" at 4.917,-1.535 h1.52
  text "BLUE" at 16.347,-1.824 h1.78
Bottom Overlay:
  text "*" at 13.849,32.131 h2.54
  text "* >> 0.1uF" at 48.791,28.128 h2.03
  text "$ >> 10K" at 48.791,26.322 h2.03
  text "$" at 17.109,23.027 h1.52
  text "$" at 36.515,22.494 h1.52
  text "$" at 32.73,19.598 h1.52
  text "*" at 29.073,19.333 h2.54
  text "$" at 22.697,19.293 h1.52
  text "*" at 7.94,6.163 h2.54
  text "$" at 43.856,3.647 h1.52
  text "*" at 13.782,0.245 h2.54
Mechanical 2:
  lines w0.254: -1.966,-2.017 49.034,-2.017 49.034,34.983 -1.966,35.108 -1.966,32.771 -1.966,26.167 4.765,26.167 4.765,7.092 -1.966,7.092 -1.966,6.889 -1.966,-1.961 ; -1.966,-0.147 -1.966,0.564

## Dimensions
49.034,34.983 to 49.034,-2.017 on Mechanical 1
-1.966,35.108 to 49.034,34.983 on Mechanical 1
24.012,4.737 to -1.966,-2.017 on Mechanical 1
24.012,4.737 to 49.034,-2.017 on Mechanical 1

## Text inside footprints (layer, text, board x,y; h text height)
J1: Top Overlay "Board Edge" at 9.745,34.638 h0.5 r180
U1: Mechanical 1 "Board Cutout" at 1.715,12.881 h0.7 r90